# Altium PCB Pod_Islands_Panel_1x2.PcbDoc (part 2 of 2)
Units mm, origin at the board's own origin, x right, y up, seen from the top; angles counter-clockwise.
Board outline 46.91 x 48.3 mm, 6 copper layers (Top Layer, Inner1, Inner2, Inner3, Inner4, Bottom Layer), stack 0.82 mm thick; 110 components, 94 nets, 498 pads, 368 vias.
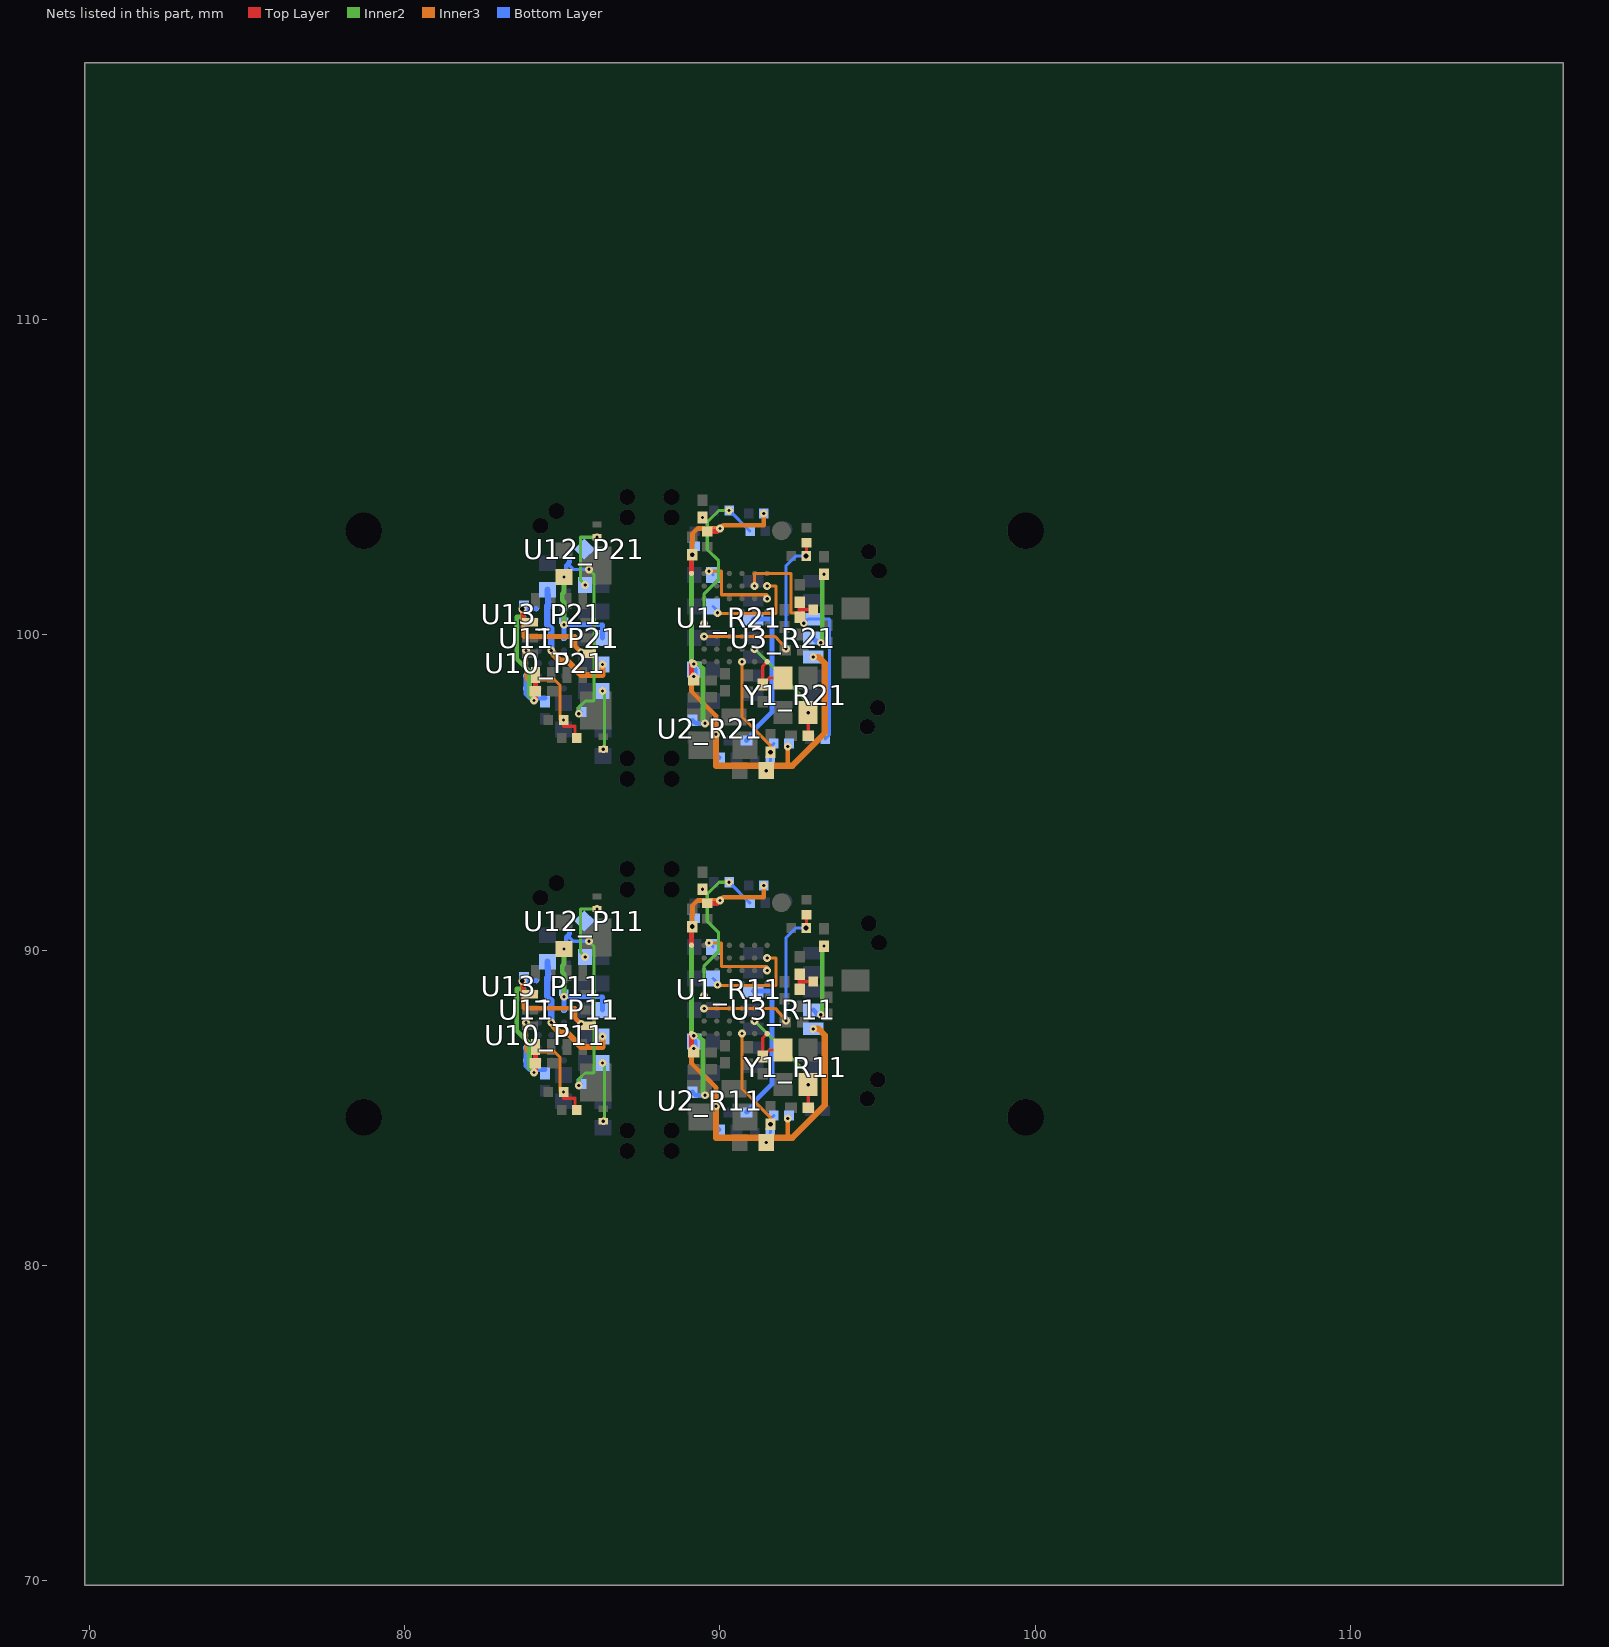
[diagram p6: the nets of this part, all layers, seen from the top]

## Via types
v1: diameter 0.249, hole 0.102, Top Layer to Inner1, 92 vias
v2: diameter 0.249, hole 0.102, Inner1 to Bottom Layer, 74 vias
v3: diameter 0.249, hole 0.102, Top Layer to Inner4, 58 vias
v4: diameter 0.249, hole 0.152, Top Layer to Bottom Layer, 54 vias
v5: diameter 0.249, hole 0.102, Inner4 to Bottom Layer, 52 vias
v6: diameter 0.3, hole 0.152, Inner1 to Inner4, 38 vias

## Nets (pads, with @x,y where several pads share a name; then routed paths per layer and width w, separated by ;. In a path a pad name is that pad's centre, name@x,y a point inside that pad or via, vN(x,y) a via of type N, cw(c..) or ccw(c..) an arc to the next point about the centre after c; other vN are vias at no path point) (continued)
PPG_LDO_EN_R21: R5_R21.1 U1_R21.G2 U3_R21.3 | length 8.3
  Inner3 w0.1: v3(91.1,101.55) 91.1,101.95 92.25,101.95 92.25,100.7 92.66,100.7 v2(92.66,100.37)
  Bottom Layer w0.1: v2(92.66,100.37) 92.791,100.501 U3_R21.3@92.96,100.5 93.48,100.501 93.48,96.841 R5_R21.1@93.34,96.701
PPG_VLDO_R11: C31_R11.1 U3_R11.4 | length 2.5
  Inner2 w0.15: v2(93.2,87.949) 93.25,87.999 93.25,90.076 v3(93.3,90.126)
  Bottom Layer w0.15: U3_R11.4@92.96,88.1 93.109,87.949 v2(93.2,87.949)
PPG_VLDO_R21: C31_R21.1 U3_R21.4 | length 2.5
  Inner2 w0.15: v2(93.2,99.749) 93.25,99.799 93.25,101.876 v3(93.3,101.926)
  Bottom Layer w0.15: U3_R21.4@92.959,99.899 93.109,99.749 v2(93.2,99.749)
PPG_VREF_R11: C32_R11.1 U3_R11.12 | length 4.8
  Bottom Layer w0.15: C32_R11.1@90.844,84.85 91.1,85.127 91.1,85.2 91.65,85.75 91.65,88.701 U3_R11.12@91.06,88.701
PPG_VREF_R21: C32_R21.1 U3_R21.12 | length 4.8
  Bottom Layer w0.15: C32_R21.1@90.844,96.65 91.1,96.927 91.1,97 91.65,97.55 91.65,100.501 U3_R21.12@91.06,100.5
RF_50R_R11: C42_R11.1 L3_R11.2 Z41_R11.1 | length 0.9
  Top Layer w0.124: L3_R11.2@92.53,88.762 92.53,89.001 ; C42_R11.1@92.53,89.237 92.53,89.001 ; Z41_R11.1@92.959,89.001 92.53,89.001
RF_50R_R21: C42_R21.1 L3_R21.2 Z41_R21.1 | length 0.9
  Top Layer w0.124: L3_R21.2@92.53,100.562 92.53,100.801 ; C42_R21.1@92.53,101.037 92.53,100.801 ; Z41_R21.1@92.958,100.8 92.53,100.801
SWDCLK_P11: D13_P11.1 pad.JP10@85.723,89.781 | length 2.1
  Inner2 w0.1: v2(85.724,89.781) 85.575,89.929 85.575,91.3 v3(86.1,91.3)
SWDCLK_P21: D13_P21.1 pad.JP10@85.723,101.581 | length 2.1
  Inner2 w0.1: v2(85.724,101.581) 85.575,101.729 85.575,103.1 v3(86.1,103.1)
SWDCLK_R11: pad.JR10@89.784,90.101 U1_R11.F1 | length 2.9
  Inner3 w0.1: v2(89.65,90.22) 90.05,90.22 90.05,89.475 91.499,89.475 v3(91.499,89.349)
  Bottom Layer w0.1: v2(89.65,90.22) 89.665,90.22 pad.JR10@89.784,90.101
SWDCLK_R21: pad.JR10@89.784,101.901 U1_R21.F1 | length 2.9
  Inner3 w0.1: v2(89.65,102.02) 90.05,102.02 90.05,101.275 91.499,101.275 v3(91.499,101.149)
  Bottom Layer w0.1: v2(89.65,102.02) 89.665,102.02 pad.JR10@89.784,101.901
SWDIO_P11: D12_P11.1 pad.JP1@86.274,86.42 | length 1.9
  Inner2 w0.1: v2(86.275,86.42) 86.34,86.355 86.34,84.61 v3(86.301,84.571)
SWDIO_P21: D12_P21.1 pad.JP1@86.274,98.221 | length 1.9
  Inner2 w0.1: v2(86.275,98.22) 86.34,98.155 86.34,96.41 v3(86.301,96.371)
SWDIO_R11: pad.JR9@89.784,89.1 U1_R11.G1 | length 3.3
  Inner3 w0.1: v2(89.92,88.9) 89.92,88.875 91.775,88.875 91.775,89.75 v3(91.499,89.75)
  Bottom Layer w0.1: pad.JR9@89.784,89.1 89.92,88.964 v2(89.92,88.9)
SWDIO_R21: pad.JR9@89.784,100.901 U1_R21.G1 | length 3.3
  Inner3 w0.1: v2(89.92,100.7) 89.92,100.675 91.775,100.675 91.775,101.55 v3(91.499,101.55)
  Bottom Layer w0.1: pad.JR9@89.784,100.9 89.92,100.764 v2(89.92,100.7)
TH1_SENSE_R11: C10_R11.1 R10_R11.2 TH1_R11.1 U1_R11.D6 | length 5.6
  Inner2 w0.1: v3(89.449,91.927) 89.596,91.78 89.6,91.78 ; v3(89.5,88.551) 89.5,89.5 89.96,89.96 89.96,90.55 89.6,90.91 89.6,91.78 ; v2(90.292,92.15) 89.97,92.15 89.6,91.78
  Bottom Layer w0.1: v2(90.292,92.15) 90.94,91.5 R10_R11.2@90.958,91.5
TH1_SENSE_R21: C10_R21.1 R10_R21.2 TH1_R21.1 U1_R21.D6 | length 5.6
  Inner2 w0.1: v3(89.449,103.727) 89.596,103.58 89.6,103.58 ; v3(89.5,100.351) 89.5,101.3 89.96,101.76 89.96,102.35 89.6,102.71 89.6,103.58 ; v2(90.292,103.95) 89.97,103.95 89.6,103.58
  Bottom Layer w0.1: v2(90.292,103.95) 90.94,103.3 R10_R21.2@90.958,103.3
TH4_SENSE_R11: R11_R11.2 TH4_R11.1 U1_R11.C6 | length 6.6
  Top Layer w0.1: v4(92.735,90.7) 92.751,90.71 TH4_R11.1@92.751,91.119
  Inner3 w0.1: v3(89.5,88.15) 91.75,88.15 v2(92.1,87.76)
  Bottom Layer w0.1: v2(92.1,87.76) 92.1,90.4 92.4,90.7 v4(92.735,90.7)
TH4_SENSE_R21: R11_R21.2 TH4_R21.1 U1_R21.C6 | length 6.6
  Top Layer w0.1: v4(92.735,102.5) 92.751,102.51 TH4_R21.1@92.75,102.918
  Inner3 w0.1: v3(89.5,99.95) 91.75,99.95 v2(92.1,99.56)
  Bottom Layer w0.1: v2(92.1,99.56) 92.1,102.2 92.4,102.5 v4(92.735,102.5)
TS_P11: R50_P11.1 TH5_P11.1 U10_P11.B4 | length 4.2
  Top Layer w0.1: v3(85.041,85.501) 85.041,85.3 85.4,85.3 R50_P11.1@85.4,84.929
  Inner3 w0.1: v2(83.85,87.7) 83.85,86.775 84.75,86.775 84.925,86.6 84.925,85.5 v3(85.041,85.501)
TS_P21: R50_P21.1 TH5_P21.1 U10_P21.B4 | length 4.2
  Top Layer w0.1: v3(85.041,97.301) 85.041,97.1 85.4,97.1 R50_P21.1@85.4,96.729
  Inner3 w0.1: v2(83.85,99.5) 83.85,98.575 84.75,98.575 84.925,98.4 84.925,97.3 v3(85.041,97.301)
U12_EP_P11: U12_P11.5
U12_EP_P21: U12_P21.5
U12_VDD_P11: C55_P11.1 R51_P11.2 U12_P11.1 | length 6.5
  Inner2 w0.1: v2(85.52,85.7) 85.52,85.9 85.72,86.1 86,86.1 86,90.13 v2(85.85,90.28)
  Bottom Layer w0.1: 85.224,90.504 85.224,90.406 85.35,90.28 v2(85.85,90.28) ; v2(85.52,85.7) 85.558,85.7 R51_P11.2@85.608,85.75
  Bottom Layer w0.15: C55_P11.1@85.12,90.039 85.12,90.4 85.224,90.504 U12_P11.1@85.224,90.596
U12_VDD_P21: C55_P21.1 R51_P21.2 U12_P21.1 | length 6.5
  Inner2 w0.1: v2(85.52,97.5) 85.52,97.7 85.72,97.9 86,97.9 86,101.93 v2(85.85,102.08)
  Bottom Layer w0.1: 85.224,102.304 85.224,102.206 85.35,102.08 v2(85.85,102.08) ; v2(85.52,97.5) 85.558,97.5 R51_P21.2@85.607,97.55
  Bottom Layer w0.15: C55_P21.1@85.12,101.839 85.12,102.2 85.224,102.304 U12_P21.1@85.224,102.396
VDD_1V8_R11: C5_R11.1 C8_R11.1 C21_R11.1 R1_R11.1 R2_R11.1 R3_R11.1 U1_R11.A7 U1_R11.H7 U2_R11.A2 | length 11.2
  Top Layer w0.15: U1_R11.H7@89.1,90.15 89.094,90.718 v4(89.122,90.746) ; v3(89.17,87.281) U1_R11.A7@89.1,87.35 89.101,86.824 C8_R11.1@89.175,86.75 ; R3_R11.1@89.599,91.481 89.904,91.48 v3(90,91.576)
  Inner2 w0.15: v4(89.122,90.746) 89.101,90.718 89.101,87.35 v3(89.17,87.281) 89.31,87.281 89.46,87.131 89.46,85.459 v2(89.525,85.394)
  Inner3 w0.15: v4(89.122,90.746) 89.129,91.405 89.3,91.576 v3(90,91.576) 90.104,91.68 91.392,91.68 v2(91.392,92.049)
  Bottom Layer w0.15: C21_R11.1@89.129,85.496 89.231,85.394 v2(89.525,85.394)
VDD_1V8_R21: C5_R21.1 C8_R21.1 C21_R21.1 R1_R21.1 R2_R21.1 R3_R21.1 U1_R21.A7 U1_R21.H7 U2_R21.A2 | length 11.2
  Top Layer w0.15: U1_R21.H7@89.101,101.949 89.094,102.518 v4(89.122,102.546) ; v3(89.17,99.081) U1_R21.A7@89.1,99.15 89.101,98.624 C8_R21.1@89.175,98.55 ; R3_R21.1@89.599,103.28 89.904,103.28 v3(90,103.376)
  Inner2 w0.15: v4(89.122,102.546) 89.101,102.518 89.101,99.15 v3(89.17,99.081) 89.31,99.081 89.46,98.931 89.46,97.259 v2(89.525,97.194)
  Inner3 w0.15: v4(89.122,102.546) 89.129,103.205 89.3,103.376 v3(90,103.376) 90.104,103.48 91.392,103.48 v2(91.392,103.849)
  Bottom Layer w0.15: C21_R21.1@89.129,97.296 89.231,97.194 v2(89.525,97.194)
VDD_IMU_P11: C60_P11.1 C63_P11.1 U11_P11.5 U11_P11.8 U11_P11.12 U13_P11.A2 | length 7.9
  Top Layer w0.15: v4(83.73,89.02) U11_P11.5@83.78,88.65 ; v3(84.1,86.12) 84.147,86.167 84.148,86.41 U11_P11.8@84.149,86.926
  Inner2 w0.15: v4(83.73,89.02) 83.78,88.775 83.55,88.775 83.55,87.435 83.96,87.025 83.96,86.26 v3(84.1,86.12)
  Inner3 w0.15: v4(83.73,89.02) 83.78,88.15 85.4,88.15 85.4,87.85 v3(85.6,87.65)
  Bottom Layer w0.15: 83.942,89.026 U13_P11.A2@84.175,89.026
VDD_IMU_P21: C60_P21.1 C63_P21.1 U11_P21.5 U11_P21.8 U11_P21.12 U13_P21.A2 | length 7.9
  Top Layer w0.15: v4(83.73,100.82) U11_P21.5@83.78,100.45 ; v3(84.1,97.92) 84.147,97.967 84.148,98.21 U11_P21.8@84.15,98.725
  Inner2 w0.15: v4(83.73,100.82) 83.78,100.575 83.55,100.575 83.55,99.235 83.96,98.825 83.96,98.06 v3(84.1,97.92)
  Inner3 w0.15: v4(83.73,100.82) 83.78,99.95 85.4,99.95 85.4,99.65 v3(85.6,99.45)
  Bottom Layer w0.15: 83.942,100.826 U13_P21.A2@84.175,100.825
VIN_P11: C50_P11.1 D10_P11.1 pad.JP3@86.274,88.099 U10_P11.A1 | length 3.8
  Inner2 w0.15: v2(85.051,88.52) 85.051,89.249 85,89.3 85,89.5 85.05,89.55 v3(85.051,90.036)
  Bottom Layer w0.15: U10_P11.A1@85.051,88.099 v2(85.051,88.52) ; D10_P11.1@85.051,88.65 v2(85.051,88.52) ; pad.JP3@86.275,88.099 86.275,88.52 v2(85.051,88.52)
VIN_P21: C50_P21.1 D10_P21.1 pad.JP3@86.274,99.9 U10_P21.A1 | length 3.8
  Inner2 w0.15: v2(85.051,100.32) 85.051,101.049 85,101.1 85,101.3 85.05,101.35 v3(85.051,101.836)
  Bottom Layer w0.15: U10_P21.A1@85.051,99.899 v2(85.051,100.32) ; D10_P21.1@85.051,100.45 v2(85.051,100.32) ; pad.JP3@86.275,99.899 86.275,100.32 v2(85.051,100.32)
VINLS_P11: C56_P11.1 U10_P11.D4 U10_P11.E4 | length 1.2
  Bottom Layer w0.15: U10_P11.D4@83.85,86.9 U10_P11.E4@83.85,86.5 83.85,86.32 83.97,86.2 C56_P11.1@84.449,86.2
VINLS_P21: C56_P21.1 U10_P21.D4 U10_P21.E4 | length 1.2
  Bottom Layer w0.15: U10_P21.D4@83.85,98.7 83.85,98.299 83.85,98.12 83.97,98 C56_P21.1@84.449,98
VSYS_P11: C51_P11.1 pad.JP2@86.274,87.261 U10_P11.A2 U10_P11.B2 U13_P11.A1 U13_P11.B1 | length 4.3
  Inner3 w0.2: v2(84.65,87.7) 84.725,87.625 84.725,87.575 84.925,87.375 85.15,87.375 85.6,86.925 86.275,86.925 v2(86.275,87.261)
  Bottom Layer w0.2: C51_P11.1@84.531,89.631 84.551,89.15 84.525,89.124 84.525,89.026 84.525,88.676 84.525,88.525 84.65,88.4 U10_P11.A2@84.65,88.1 v2(84.65,87.7)
VSYS_P21: C51_P21.1 pad.JP2@86.274,99.062 U10_P21.A2 U10_P21.B2 U13_P21.A1 U13_P21.B1 | length 4.3
  Inner3 w0.2: v2(84.65,99.5) 84.725,99.425 84.725,99.375 84.925,99.175 85.15,99.175 85.6,98.725 86.275,98.725 v2(86.275,99.061)
  Bottom Layer w0.2: C51_P21.1@84.53,101.43 84.551,100.95 84.525,100.924 U13_P21.A1@84.525,100.825 U13_P21.B1@84.525,100.475 84.525,100.325 84.65,100.2 84.65,99.899 v2(84.65,99.5)
VSYS_R11: C20_R11.1 C30_R11.1 pad.JR2@89.185,87.101 R40_R11.1 U2_R11.A1 U2_R11.B1 U3_R11.5 | length 11.9
  Inner3 w0.15: v2(89.17,86.88) 89.1,86.81 89.1,86.4 89.876,85.624 v2(89.876,85.046) ; 92.15,84.05 v2(92.15,84.66)
  Inner3 w0.2: v2(89.876,85.046) 89.876,84.05 91.471,84.05 ; v3(91.471,83.89) 91.471,84.05 ; v2(92.959,87.5) 93.13,87.5 93.33,87.3 93.33,85.08 92.3,84.05 92.15,84.05 91.471,84.05
  Bottom Layer w0.15: U2_R11.A1@89.875,85.395 v2(89.876,85.046) 89.876,84.398 C20_R11.1@89.975,84.299
  Bottom Layer w0.2: v2(89.17,86.88) 89.185,86.895 pad.JR2@89.185,87.101
VSYS_R21: C20_R21.1 C30_R21.1 pad.JR2@89.185,98.902 R40_R21.1 U2_R21.A1 U2_R21.B1 U3_R21.5 | length 11.9
  Inner3 w0.15: v2(89.17,98.68) 89.1,98.61 89.1,98.2 89.876,97.424 v2(89.876,96.846) ; 92.15,95.85 v2(92.15,96.46)
  Inner3 w0.2: v2(89.876,96.846) 89.876,95.85 91.471,95.85 ; v3(91.471,95.69) 91.471,95.85 ; v2(92.959,99.3) 93.13,99.3 93.33,99.1 93.33,96.88 92.3,95.85 92.15,95.85 91.471,95.85
  Bottom Layer w0.15: U2_R21.A1@89.876,97.194 v2(89.876,96.846) 89.876,96.198 C20_R21.1@89.975,96.099
  Bottom Layer w0.2: v2(89.17,98.68) 89.185,98.695 pad.JR2@89.185,98.901
VSYS_SENSE_R11: C12_R11.1 R40_R11.2 R41_R11.1 U1_R11.A3 | length 3.8
  Inner3 w0.1: v3(90.699,87.35) 90.699,85.6 91.601,84.698 v4(91.601,84.475)
  Bottom Layer w0.1: R41_R11.1@91.59,84.2 91.601,84.21 v4(91.601,84.475) 91.601,84.64 R40_R11.2@91.708,84.75
VSYS_SENSE_R21: C12_R21.1 R40_R21.2 R41_R21.1 U1_R21.A3 | length 3.8
  Inner3 w0.1: v3(90.699,99.15) 90.699,97.4 91.601,96.498 v4(91.601,96.275)
  Bottom Layer w0.1: R41_R21.1@91.59,96 91.601,96.01 v4(91.601,96.275) 91.601,96.44 R40_R21.2@91.71,96.549
XC1_R11: C1_R11.1 U1_R11.B2 Y1_R11.1 | length 3.5
  Top Layer w0.1: v3(92.799,85.729) C1_R11.1@92.804,85
  Inner2 w0.1: v3(91.1,87.751) 92.799,86.052 v3(92.799,85.729)
XC1_R21: C1_R21.1 U1_R21.B2 Y1_R21.1 | length 3.5
  Top Layer w0.1: v3(92.799,97.529) C1_R21.1@92.804,96.8
  Inner2 w0.1: v3(91.1,99.551) 92.799,97.852 v3(92.799,97.529)
XC2_R11: C2_R11.1 U1_R11.A1 Y1_R11.3 | length 1.5
  Top Layer w0.1: U1_R11.A1@91.499,87.35 91.359,87.21 91.359,86.623 91.565,86.829 Y1_R11.3@92,86.83
XC2_R21: C2_R21.1 U1_R21.A1 Y1_R21.3 | length 1.5
  Top Layer w0.1: U1_R21.A1@91.499,99.15 91.359,99.01 91.359,98.423 91.565,98.629 Y1_R21.3@91.999,98.629
pads on no net: ANT1_R11.1 ANT1_R21.1 U1_R11.A4 U1_R11.A5 U1_R11.B3 U1_R11.B4 U1_R11.B5 U1_R11.C3 U1_R11.C7 U1_R11.D3 U1_R11.D7 U1_R11.E1 U1_R11.E2 U1_R11.E6 U1_R11.E7 U1_R11.F2 U1_R11.F3 U1_R11.F4 U1_R11.F6 U1_R11.F7 U1_R11.G4 U1_R11.G5 U1_R11.G6 U1_R11.G7 U1_R21.A4 U1_R21.A5 U1_R21.B3 U1_R21.B4 U1_R21.B5 U1_R21.C3 U1_R21.C7 U1_R21.D3 U1_R21.D7 U1_R21.E1 U1_R21.E2 U1_R21.E6 U1_R21.E7 U1_R21.F2 U1_R21.F3 U1_R21.F4 U1_R21.F6 U1_R21.F7 U1_R21.G4 U1_R21.G5 U1_R21.G6 U1_R21.G7 U3_R11.6 U3_R11.7 U3_R11.8 U3_R21.6 U3_R21.7 U3_R21.8 U10_P11.C1 U10_P11.C2 U10_P11.C3 U10_P11.C4 U10_P11.D2 U10_P21.C1 U10_P21.C2 U10_P21.C3 U10_P21.C4 U10_P21.D2 U11_P11.10 U11_P11.11 U11_P21.10 U11_P21.11

## Polygon pours and split planes (outlines as drawn)
GND_R11 on Inner1 (solid, remove dead copper): 87.981,93.649 87.981,82.473 95.855,82.473 95.855,93.649
GND_R11 on Inner4 (solid, remove dead copper): 87.981,93.649 87.981,82.473 95.855,82.473 95.855,93.649
GND_R11 on Top Layer (solid, remove dead copper, pour order 4): 87.981,93.649 87.981,82.473 95.855,82.473 95.855,93.649
GND_R11 on Bottom Layer (solid, remove dead copper, pour order 8): 87.981,93.649 87.981,82.473 95.855,82.473 95.855,93.649
GND_P11 on Inner4 (solid, remove dead copper): 82.981,93.014 82.981,83.108 87.045,83.108 87.045,93.014
GND_P11 on Inner1 (solid, remove dead copper): 82.981,93.014 82.981,83.108 87.045,83.108 87.045,93.014
GND_P21 on Inner4 (solid, remove dead copper): 82.981,104.814 82.981,94.908 87.045,94.908 87.045,104.814
GND_P21 on Inner1 (solid, remove dead copper): 82.981,104.814 82.981,94.908 87.045,94.908 87.045,104.814
GND_R21 on Inner1 (solid, remove dead copper): 87.981,105.449 87.981,94.273 95.855,94.273 95.855,105.449
GND_R21 on Inner4 (solid, remove dead copper): 87.981,105.449 87.981,94.273 95.855,94.273 95.855,105.449
GND_R21 on Top Layer (solid, remove dead copper, pour order 44): 87.981,105.449 87.981,94.273 95.855,94.273 95.855,105.449
GND_R21 on Bottom Layer (solid, remove dead copper, pour order 48): 87.981,105.449 87.981,94.273 95.855,94.273 95.855,105.449

## Keep-outs
Top Layer:
  region: 90.141,83.153 90.153,83.552 90.386,83.551 90.617,83.561 90.848,83.583 91.078,83.617 91.147,83.223 90.897,83.186 90.645,83.162 90.393,83.151 90.141,83.153
  region: 92.325,83.583 92.162,83.948 92.371,84.049 92.575,84.16 92.773,84.281 92.965,84.412 93.199,84.088 92.99,83.945 92.775,83.813 92.553,83.693 92.325,83.583
  region: 93.199,92.112 92.965,91.788 92.773,91.919 92.575,92.04 92.371,92.151 92.162,92.252 92.325,92.617 92.553,92.507 92.775,92.387 92.99,92.255 93.199,92.112
  region: 91.147,92.977 91.078,92.583 90.848,92.617 90.617,92.639 90.386,92.649 90.153,92.648 90.141,93.047 90.393,93.049 90.645,93.038 90.897,93.014 91.147,92.977
  region: 93.66,84.465 93.66,88.874 94.601,88.874 94.601,89.128 93.66,89.128 93.66,91.735 93.884,91.515 94.093,91.281 94.287,91.034 94.465,90.775 94.626,90.506 94.77,90.227 94.896,89.939 95.003,89.644 95.092,89.343 95.161,89.036 95.21,88.726 95.24,88.414 95.25,88.1 95.24,87.786 95.21,87.474 95.161,87.164 95.092,86.857 95.003,86.556 94.896,86.261 94.77,85.973 94.626,85.694 94.465,85.425 94.287,85.166 94.093,84.919 93.884,84.685 93.66,84.465
  region: 88.9,87.15 88.9,90.35 91.7,90.35 91.7,87.15
  region: 86.558,92.804 86.682,92.424 86.464,92.346 86.249,92.257 86.04,92.157 85.836,92.047 85.636,92.393 85.859,92.514 86.087,92.622 86.32,92.719 86.558,92.804
  region: 85.636,83.807 85.836,84.154 86.04,84.043 86.249,83.943 86.464,83.854 86.682,83.776 86.558,83.396 86.32,83.481 86.087,83.578 85.859,83.687 85.636,83.807
  region: 86.558,104.604 86.682,104.224 86.464,104.146 86.249,104.057 86.04,103.957 85.836,103.847 85.636,104.193 85.859,104.314 86.087,104.422 86.32,104.519 86.558,104.604
  region: 85.636,95.607 85.836,95.954 86.04,95.843 86.249,95.743 86.464,95.654 86.682,95.576 86.558,95.196 86.32,95.281 86.087,95.378 85.859,95.487 85.636,95.607
  region: 90.141,94.953 90.153,95.352 90.386,95.351 90.617,95.361 90.848,95.383 91.078,95.417 91.147,95.023 90.897,94.986 90.645,94.962 90.393,94.951 90.141,94.953
  region: 92.325,95.383 92.162,95.748 92.371,95.849 92.575,95.96 92.773,96.081 92.965,96.212 93.199,95.888 92.99,95.745 92.775,95.613 92.553,95.493 92.325,95.383
  region: 93.199,103.912 92.965,103.588 92.773,103.719 92.575,103.84 92.371,103.951 92.162,104.052 92.325,104.417 92.553,104.307 92.775,104.187 92.99,104.055 93.199,103.912
  region: 91.147,104.777 91.078,104.383 90.848,104.417 90.617,104.439 90.386,104.449 90.153,104.448 90.141,104.847 90.393,104.849 90.645,104.838 90.897,104.814 91.147,104.777
  region: 93.66,96.265 93.66,100.674 94.601,100.674 94.601,100.928 93.66,100.928 93.66,103.535 93.884,103.315 94.093,103.081 94.287,102.834 94.465,102.575 94.626,102.306 94.77,102.027 94.896,101.739 95.003,101.444 95.092,101.143 95.161,100.836 95.21,100.526 95.24,100.214 95.25,99.9 95.24,99.586 95.21,99.274 95.161,98.964 95.092,98.657 95.003,98.356 94.896,98.061 94.77,97.773 94.626,97.494 94.465,97.225 94.287,96.966 94.093,96.719 93.884,96.485 93.66,96.265
  region: 88.9,98.95 88.9,102.15 91.7,102.15 91.7,98.95
Inner1:
  region: 93.66,84.465 93.66,91.735 93.884,91.515 94.093,91.281 94.287,91.034 94.465,90.775 94.626,90.506 94.77,90.227 94.896,89.939 95.003,89.644 95.092,89.343 95.161,89.036 95.21,88.726 95.24,88.414 95.25,88.1 95.24,87.786 95.21,87.474 95.161,87.164 95.092,86.857 95.003,86.556 94.896,86.261 94.77,85.973 94.626,85.694 94.465,85.425 94.287,85.166 94.093,84.919 93.884,84.685 93.66,84.465
  region: 93.66,96.265 93.66,103.535 93.884,103.315 94.093,103.081 94.287,102.834 94.465,102.575 94.626,102.306 94.77,102.027 94.896,101.739 95.003,101.444 95.092,101.143 95.161,100.836 95.21,100.526 95.24,100.214 95.25,99.9 95.24,99.586 95.21,99.274 95.161,98.964 95.092,98.657 95.003,98.356 94.896,98.061 94.77,97.773 94.626,97.494 94.465,97.225 94.287,96.966 94.093,96.719 93.884,96.485 93.66,96.265
Inner2:
  region: 93.66,84.465 93.66,91.735 93.884,91.515 94.093,91.281 94.287,91.034 94.465,90.775 94.626,90.506 94.77,90.227 94.896,89.939 95.003,89.644 95.092,89.343 95.161,89.036 95.21,88.726 95.24,88.414 95.25,88.1 95.24,87.786 95.21,87.474 95.161,87.164 95.092,86.857 95.003,86.556 94.896,86.261 94.77,85.973 94.626,85.694 94.465,85.425 94.287,85.166 94.093,84.919 93.884,84.685 93.66,84.465
  region: 93.66,96.265 93.66,103.535 93.884,103.315 94.093,103.081 94.287,102.834 94.465,102.575 94.626,102.306 94.77,102.027 94.896,101.739 95.003,101.444 95.092,101.143 95.161,100.836 95.21,100.526 95.24,100.214 95.25,99.9 95.24,99.586 95.21,99.274 95.161,98.964 95.092,98.657 95.003,98.356 94.896,98.061 94.77,97.773 94.626,97.494 94.465,97.225 94.287,96.966 94.093,96.719 93.884,96.485 93.66,96.265
Inner3:
  region: 93.66,84.465 93.66,91.735 93.884,91.515 94.093,91.281 94.287,91.034 94.465,90.775 94.626,90.506 94.77,90.227 94.896,89.939 95.003,89.644 95.092,89.343 95.161,89.036 95.21,88.726 95.24,88.414 95.25,88.1 95.24,87.786 95.21,87.474 95.161,87.164 95.092,86.857 95.003,86.556 94.896,86.261 94.77,85.973 94.626,85.694 94.465,85.425 94.287,85.166 94.093,84.919 93.884,84.685 93.66,84.465
  region: 93.66,96.265 93.66,103.535 93.884,103.315 94.093,103.081 94.287,102.834 94.465,102.575 94.626,102.306 94.77,102.027 94.896,101.739 95.003,101.444 95.092,101.143 95.161,100.836 95.21,100.526 95.24,100.214 95.25,99.9 95.24,99.586 95.21,99.274 95.161,98.964 95.092,98.657 95.003,98.356 94.896,98.061 94.77,97.773 94.626,97.494 94.465,97.225 94.287,96.966 94.093,96.719 93.884,96.485 93.66,96.265
Inner4:
  region: 93.66,84.465 93.66,91.735 93.884,91.515 94.093,91.281 94.287,91.034 94.465,90.775 94.626,90.506 94.77,90.227 94.896,89.939 95.003,89.644 95.092,89.343 95.161,89.036 95.21,88.726 95.24,88.414 95.25,88.1 95.24,87.786 95.21,87.474 95.161,87.164 95.092,86.857 95.003,86.556 94.896,86.261 94.77,85.973 94.626,85.694 94.465,85.425 94.287,85.166 94.093,84.919 93.884,84.685 93.66,84.465
  region: 93.66,96.265 93.66,103.535 93.884,103.315 94.093,103.081 94.287,102.834 94.465,102.575 94.626,102.306 94.77,102.027 94.896,101.739 95.003,101.444 95.092,101.143 95.161,100.836 95.21,100.526 95.24,100.214 95.25,99.9 95.24,99.586 95.21,99.274 95.161,98.964 95.092,98.657 95.003,98.356 94.896,98.061 94.77,97.773 94.626,97.494 94.465,97.225 94.287,96.966 94.093,96.719 93.884,96.485 93.66,96.265
Bottom Layer:
  region: 90.141,83.153 90.153,83.552 90.386,83.551 90.617,83.561 90.848,83.583 91.078,83.617 91.147,83.223 90.897,83.186 90.645,83.162 90.393,83.151 90.141,83.153
  region: 92.325,83.583 92.162,83.948 92.371,84.049 92.575,84.16 92.773,84.281 92.965,84.412 93.199,84.088 92.99,83.945 92.775,83.813 92.553,83.693 92.325,83.583
  region: 93.199,92.112 92.965,91.788 92.773,91.919 92.575,92.04 92.371,92.151 92.162,92.252 92.325,92.617 92.553,92.507 92.775,92.387 92.99,92.255 93.199,92.112
  region: 91.147,92.977 91.078,92.583 90.848,92.617 90.617,92.639 90.386,92.649 90.153,92.648 90.141,93.047 90.393,93.049 90.645,93.038 90.897,93.014 91.147,92.977
  region: 93.66,84.465 93.66,91.735 93.884,91.515 94.093,91.281 94.287,91.034 94.465,90.775 94.626,90.506 94.77,90.227 94.896,89.939 95.003,89.644 95.092,89.343 95.161,89.036 95.21,88.726 95.24,88.414 95.25,88.1 95.24,87.786 95.21,87.474 95.161,87.164 95.092,86.857 95.003,86.556 94.896,86.261 94.77,85.973 94.626,85.694 94.465,85.425 94.287,85.166 94.093,84.919 93.884,84.685 93.66,84.465
  region: 86.558,92.804 86.682,92.424 86.464,92.346 86.249,92.257 86.04,92.157 85.836,92.047 85.636,92.393 85.859,92.514 86.087,92.622 86.32,92.719 86.558,92.804
  region: 85.636,83.807 85.836,84.154 86.04,84.043 86.249,83.943 86.464,83.854 86.682,83.776 86.558,83.396 86.32,83.481 86.087,83.578 85.859,83.687 85.636,83.807
  region: 86.558,104.604 86.682,104.224 86.464,104.146 86.249,104.057 86.04,103.957 85.836,103.847 85.636,104.193 85.859,104.314 86.087,104.422 86.32,104.519 86.558,104.604
  region: 85.636,95.607 85.836,95.954 86.04,95.843 86.249,95.743 86.464,95.654 86.682,95.576 86.558,95.196 86.32,95.281 86.087,95.378 85.859,95.487 85.636,95.607
  region: 90.141,94.953 90.153,95.352 90.386,95.351 90.617,95.361 90.848,95.383 91.078,95.417 91.147,95.023 90.897,94.986 90.645,94.962 90.393,94.951 90.141,94.953
  region: 92.325,95.383 92.162,95.748 92.371,95.849 92.575,95.96 92.773,96.081 92.965,96.212 93.199,95.888 92.99,95.745 92.775,95.613 92.553,95.493 92.325,95.383
  region: 93.199,103.912 92.965,103.588 92.773,103.719 92.575,103.84 92.371,103.951 92.162,104.052 92.325,104.417 92.553,104.307 92.775,104.187 92.99,104.055 93.199,103.912
  region: 91.147,104.777 91.078,104.383 90.848,104.417 90.617,104.439 90.386,104.449 90.153,104.448 90.141,104.847 90.393,104.849 90.645,104.838 90.897,104.814 91.147,104.777
  region: 93.66,96.265 93.66,103.535 93.884,103.315 94.093,103.081 94.287,102.834 94.465,102.575 94.626,102.306 94.77,102.027 94.896,101.739 95.003,101.444 95.092,101.143 95.161,100.836 95.21,100.526 95.24,100.214 95.25,99.9 95.24,99.586 95.21,99.274 95.161,98.964 95.092,98.657 95.003,98.356 94.896,98.061 94.77,97.773 94.626,97.494 94.465,97.225 94.287,96.966 94.093,96.719 93.884,96.485 93.66,96.265
Board Outline Layer:
  drawing of 1732 lines, arcs and shapes, not listed

## Other copper
Top Layer:
  region: 82.2,109.3 82.196,109.235 82.183,109.171 82.162,109.109 82.133,109.05 82.097,108.996 82.054,108.946 82.004,108.903 81.95,108.867 81.891,108.838 81.829,108.817 81.765,108.804 81.7,108.8 81.635,108.804 81.571,108.817 81.509,108.838 81.45,108.867 81.396,108.903 81.346,108.946 81.303,108.996 81.267,109.05 81.238,109.109 81.217,109.171 81.204,109.235 81.2,109.3 81.204,109.365 81.217,109.429 81.238,109.491 81.267,109.55 81.303,109.604 81.346,109.654 81.396,109.697 81.45,109.733 81.509,109.762 81.571,109.783 81.635,109.796 81.7,109.8 81.765,109.796 81.829,109.783 81.891,109.762 81.95,109.733 82.004,109.697 82.054,109.654 82.097,109.604 82.133,109.55 82.162,109.491 82.183,109.429 82.196,109.365
  region: 97.2,109.3 97.196,109.235 97.183,109.171 97.162,109.109 97.133,109.05 97.097,108.996 97.054,108.946 97.004,108.903 96.95,108.867 96.891,108.838 96.829,108.817 96.765,108.804 96.7,108.8 96.635,108.804 96.571,108.817 96.509,108.838 96.45,108.867 96.396,108.903 96.346,108.946 96.303,108.996 96.267,109.05 96.238,109.109 96.217,109.171 96.204,109.235 96.2,109.3 96.204,109.365 96.217,109.429 96.238,109.491 96.267,109.55 96.303,109.604 96.346,109.654 96.396,109.697 96.45,109.733 96.509,109.762 96.571,109.783 96.635,109.796 96.7,109.8 96.765,109.796 96.829,109.783 96.891,109.762 96.95,109.733 97.004,109.697 97.054,109.654 97.097,109.604 97.133,109.55 97.162,109.491 97.183,109.429 97.196,109.365
  region: 82.2,78.7 82.196,78.635 82.183,78.571 82.162,78.509 82.133,78.45 82.097,78.396 82.054,78.346 82.004,78.303 81.95,78.267 81.891,78.238 81.829,78.217 81.765,78.204 81.7,78.2 81.635,78.204 81.571,78.217 81.509,78.238 81.45,78.267 81.396,78.303 81.346,78.346 81.303,78.396 81.267,78.45 81.238,78.509 81.217,78.571 81.204,78.635 81.2,78.7 81.204,78.765 81.217,78.829 81.238,78.891 81.267,78.95 81.303,79.004 81.346,79.054 81.396,79.097 81.45,79.133 81.509,79.162 81.571,79.183 81.635,79.196 81.7,79.2 81.765,79.196 81.829,79.183 81.891,79.162 81.95,79.133 82.004,79.097 82.054,79.054 82.097,79.004 82.133,78.95 82.162,78.891 82.183,78.829 82.196,78.765
Bottom Layer:
  region: 82.2,109.3 82.196,109.235 82.183,109.171 82.162,109.109 82.133,109.05 82.097,108.996 82.054,108.946 82.004,108.903 81.95,108.867 81.891,108.838 81.829,108.817 81.765,108.804 81.7,108.8 81.635,108.804 81.571,108.817 81.509,108.838 81.45,108.867 81.396,108.903 81.346,108.946 81.303,108.996 81.267,109.05 81.238,109.109 81.217,109.171 81.204,109.235 81.2,109.3 81.204,109.365 81.217,109.429 81.238,109.491 81.267,109.55 81.303,109.604 81.346,109.654 81.396,109.697 81.45,109.733 81.509,109.762 81.571,109.783 81.635,109.796 81.7,109.8 81.765,109.796 81.829,109.783 81.891,109.762 81.95,109.733 82.004,109.697 82.054,109.654 82.097,109.604 82.133,109.55 82.162,109.491 82.183,109.429 82.196,109.365
  region: 97.2,109.3 97.196,109.235 97.183,109.171 97.162,109.109 97.133,109.05 97.097,108.996 97.054,108.946 97.004,108.903 96.95,108.867 96.891,108.838 96.829,108.817 96.765,108.804 96.7,108.8 96.635,108.804 96.571,108.817 96.509,108.838 96.45,108.867 96.396,108.903 96.346,108.946 96.303,108.996 96.267,109.05 96.238,109.109 96.217,109.171 96.204,109.235 96.2,109.3 96.204,109.365 96.217,109.429 96.238,109.491 96.267,109.55 96.303,109.604 96.346,109.654 96.396,109.697 96.45,109.733 96.509,109.762 96.571,109.783 96.635,109.796 96.7,109.8 96.765,109.796 96.829,109.783 96.891,109.762 96.95,109.733 97.004,109.697 97.054,109.654 97.097,109.604 97.133,109.55 97.162,109.491 97.183,109.429 97.196,109.365
  region: 82.2,78.7 82.196,78.635 82.183,78.571 82.162,78.509 82.133,78.45 82.097,78.396 82.054,78.346 82.004,78.303 81.95,78.267 81.891,78.238 81.829,78.217 81.765,78.204 81.7,78.2 81.635,78.204 81.571,78.217 81.509,78.238 81.45,78.267 81.396,78.303 81.346,78.346 81.303,78.396 81.267,78.45 81.238,78.509 81.217,78.571 81.204,78.635 81.2,78.7 81.204,78.765 81.217,78.829 81.238,78.891 81.267,78.95 81.303,79.004 81.346,79.054 81.396,79.097 81.45,79.133 81.509,79.162 81.571,79.183 81.635,79.196 81.7,79.2 81.765,79.196 81.829,79.183 81.891,79.162 81.95,79.133 82.004,79.097 82.054,79.054 82.097,79.004 82.133,78.95 82.162,78.891 82.183,78.829 82.196,78.765

## Silkscreen, mask and mechanical layers (free items; w line width, h text height)
Top Solder Mask Layer:
  drawing of 15 lines, arcs and shapes, not listed
Bottom Solder Mask Layer:
  drawing of 15 lines, arcs and shapes, not listed
Document Layer:
  text "LAYOUT NOTES - RADIO ISLAND (EVT)  6L HDI 1+4+1, 0.82 mm, JLC06081H-2313, ENIG, vias filled + capped" at 96.1,93 h0.23
  text "Stack: L1 signal + RF + GND pour | L2 solid GND | L3 signal | L4 signal | L5 solid GND | L6 signal + bottom parts + GND pour" at 96.1,92.68 h0.18
  text "RF: ANT(D1) > C3 1.0pF shunt > L3 3.3nH > 50R CPWG on L1, 0.124 w / 0.127 gap, L2 ref (2313 prepreg 0.0964, sim 52.7 R) > pi C42/Z41/C40 > ANT1" at 96.1,92.36 h0.18
  text "RF: ARC bends r >= 3w, no vias in the line, no stubs; GND fence microvias (L1-L2) both sides <= 1 mm; tune the pi on a VNA" at 96.1,92.04 h0.18
  text "Antenna zone x >= 18.76 mm: no copper on L2-L6 (full regions); L1 notched only for the feed to ANT1 (ANT1 pin 1 unconnected). Via fence along its edge" at 96.1,91.72 h0.18
  text "U1: copy Nordic CIAA DC/DC reference. DEC caps at their balls; DCC>L1>L2>DEC4 loop smallest, away from RF and Y1" at 96.1,91.4 h0.18
  text "Y1 NX1612SA 1.88 mm from XC1/XC2. No vias in XC traces, GND ring, nothing switching under" at 96.1,91.08 h0.18
  text "U3 MAXM86161 (bottom): microvias L4-L3 + buried vias for PGND / GND_DIG / GND_ANA; C30 (VLED) with its own via" at 96.1,90.76 h0.18
  text "Vias: laser L1-L2 / L5-L6 0.10/0.25 filled in ball pads; buried L2-L5 0.15/0.30; stacked skip L1-L5 / L2-L6 0.10/0.25; through 0.15/0.25. No through via under U1" at 96.1,90.44 h0.18
  text "Purple bands = board clamps: no parts on either side. Copper >= 0.2 mm from the edge" at 96.1,90.12 h0.18
  text "L2-L5 GND ties around the perimeter (target <= 1.0 mm, max gap 2.4 mm < lambda/20). Placement: hardware/placement/placement_20p9.json" at 96.1,89.8 h0.18